# Altium PCB PCB_top.PcbDoc (part 2 of 2)
Units mil, origin at the board's own origin, x right, y up, seen from the top; angles counter-clockwise.
Board outline 2425.02 x 2425.02 mil, 4 copper layers (TOP, 2, 3, BOTTOM), stack 61.024 mil thick; 91 components, 64 nets, 335 pads, 235 vias.
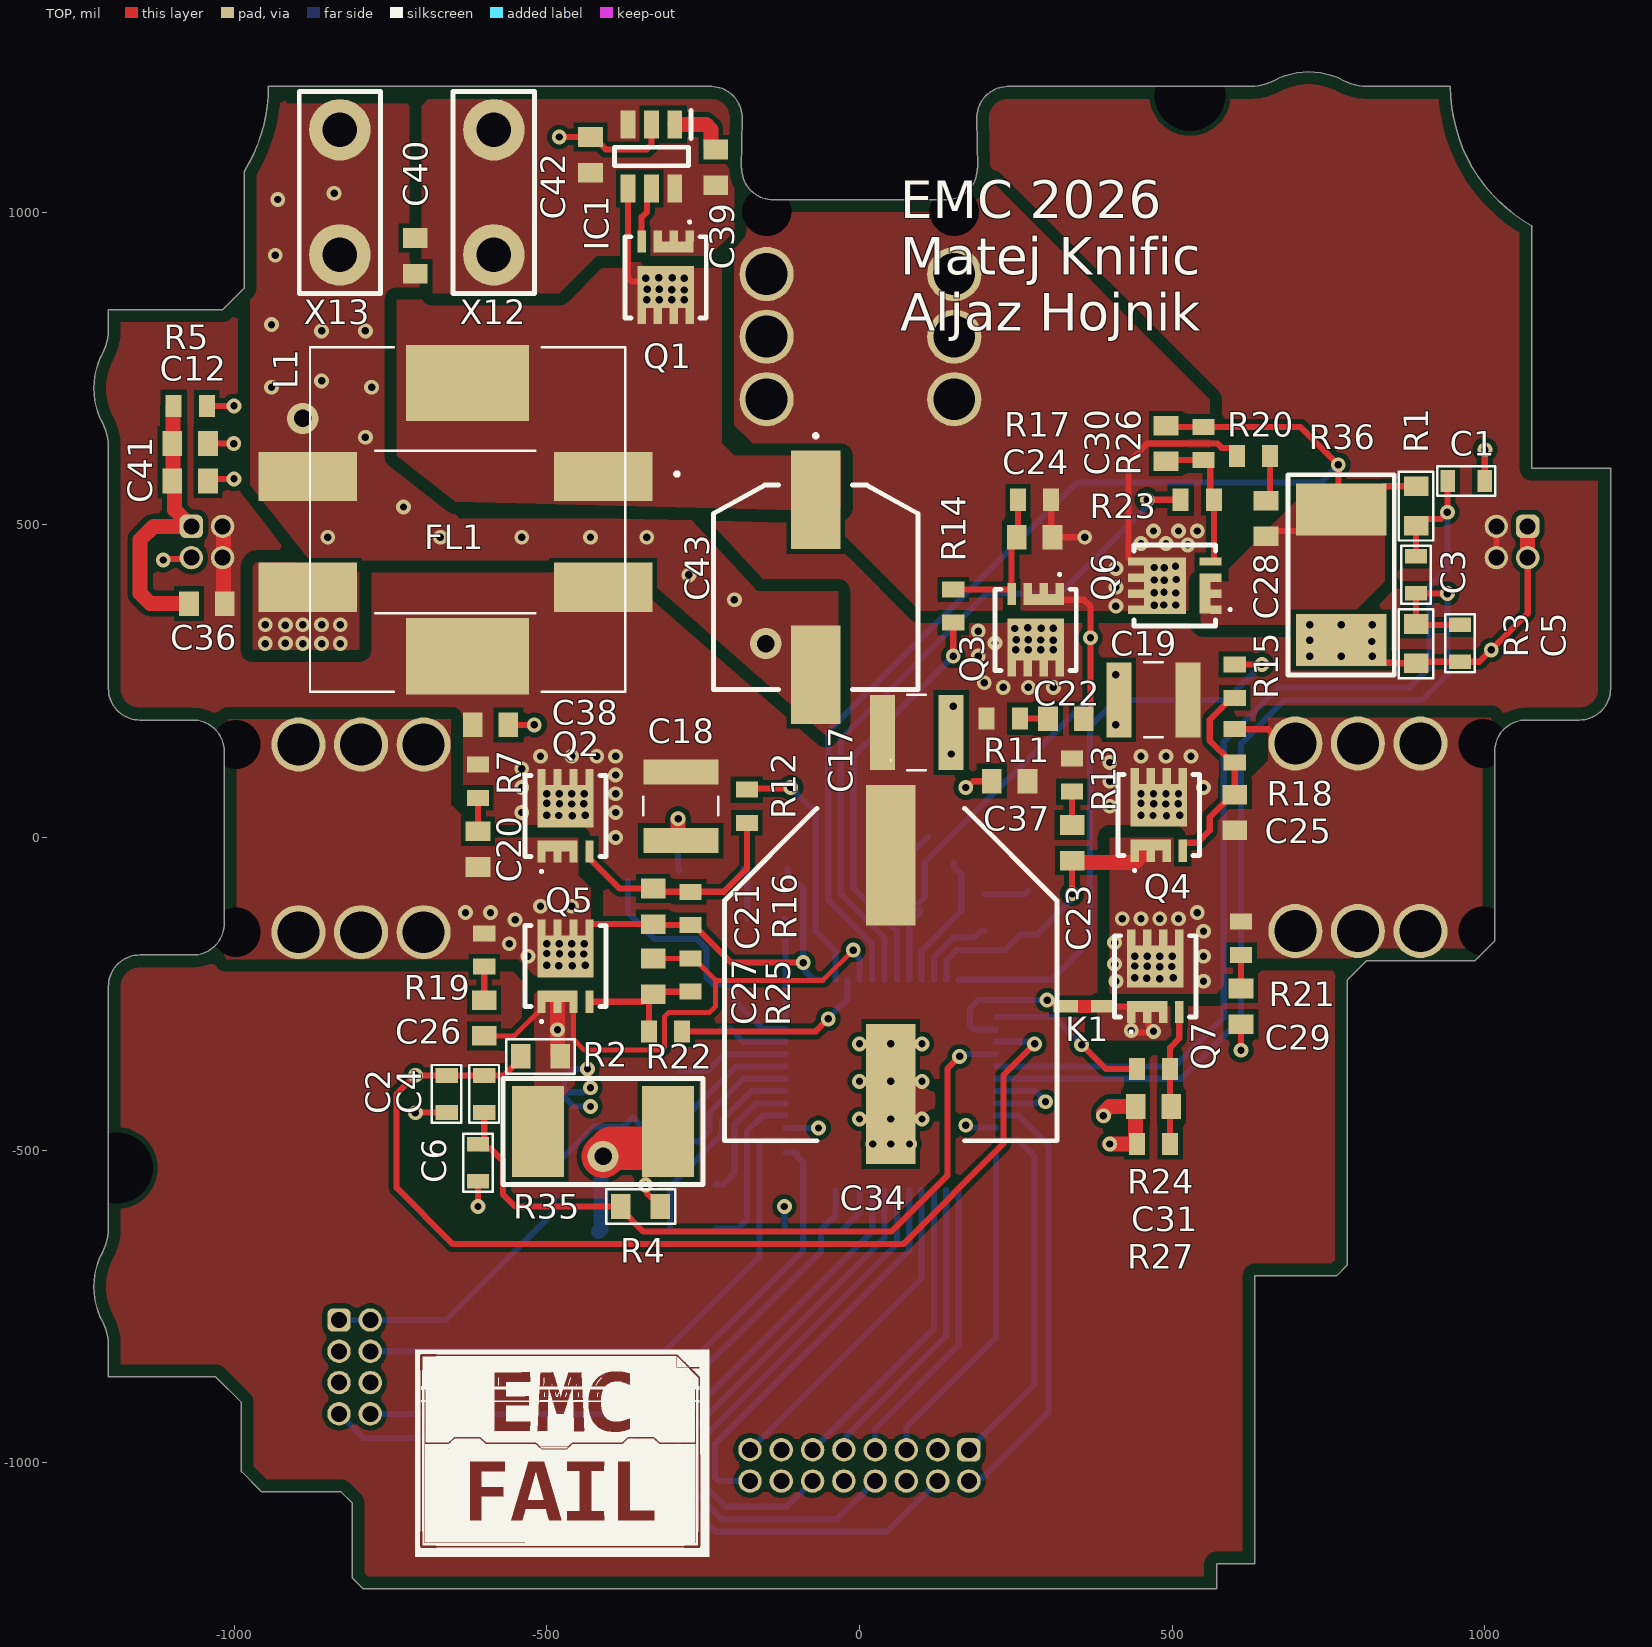
[diagram p0: TOP view]

## Silkscreen, mask and mechanical layers (free items; w line width, h text height) (continued)
Mechanical 3: (continued)
  lines w7.87: -188.94,1070.27 -187.67,1149.59 ccw(c-237.55,1150.91) -236.22,1200.79 -944.88,1200.79 cw(c-1200.79,1200.79) -983.78,1065.16 -983.78,878.43 -1018.03,844.17 -1200.79,844.17 -1200.79,811.49 cw(c-1279.53,811.49) -1210.16,774.22 ccw(c-1106.12,718.32) -1210.16,662.42 cw(c-1279.53,625.16) -1200.79,625.16 -1200.79,295.28 -1200.79,237.8 ccw(c-1150.79,237.8) -1150.79,187.8 -1065.75,187.8 cw(c-1065.75,137.8) -1015.75,137.8 -1015.75,-137.8 cw(c-1065.75,-137.8) -1065.75,-187.8 -1150.79,-187.8 ccw(c-1150.79,-237.8) -1200.79,-237.8 -1200.79,-295.28 -1200.79,-625.16 cw(c-1279.53,-625.16) -1210.16,-662.42 ccw(c-1106.12,-718.32) -1210.16,-774.22 cw(c-1279.53,-811.49) -1200.79,-811.49 -1200.79,-862.2 -1029.53,-862.2 -988.19,-903.54 -988.19,-1013.78 -955.71,-1046.26 -828.74,-1046.26 -811.02,-1063.98 -811.02,-1184.06 -794.29,-1200.79 -625.16,-1200.79 570.87,-1200.79 570.87,-1161.42 632.09,-1161.42 632.08,-700.99 762.53,-700.99 779.53,-683.99 779.53,-228.29 810.96,-196.85 984.44,-196.85 1015.75,-165.54 1015.75,137.8 cw(c1065.75,137.8) 1065.75,187.8 1150.79,187.8 ccw(c1150.79,237.8) 1200.79,237.8 1200.79,295.28 1200.79,590.55 1074.8,590.55 1074.8,978.04 ; -188.5,1070.27 ccw(c-137.92,1070.27) -137.92,1019.69 ; -137.8,1019.69 0,1019.69 137.8,1019.69 ; 137.92,1019.69 ccw(c137.92,1070.27) 188.5,1070.27 ; 188.94,1070.27 187.67,1149.59 cw(c237.55,1150.91) 236.22,1200.79 ; 240.16,1200.79 625.16,1200.79 ccw(c625.16,1279.53) 662.42,1210.16 cw(c718.32,1106.12) 774.22,1210.16 ccw(c811.49,1279.53) 811.49,1200.79 944.88,1200.79 ccw(c1200.79,1200.79) 1075.51,977.64
Mechanical 4:
  circle w10: c0,0 r1043.31
  circle w3.94: c-10,0 r1318.9
Mechanical 7:
  circle w3.94: c-1062.99,-846.46 r169.29
  circle w3.94: c-1062.99,-767.72 r169.29
  circle w3.94: c688.98,-1082.68 r147.64
  circle w3.94: c688.98,-885.83 r147.64
  circle w3.94: c19.68,-1082.68 r147.64
  circle w3.94: c98.43,-1082.68 r147.64
  circle w3.94: c177.17,-1082.68 r147.64
  circle w3.94: c-488.98,-1023.62 r169.29
  circle w3.94: c-333.07,-1023.62 r169.29
  circle w3.94: c-177.17,-1023.62 r169.29
Overlay print TOP:
  text "V" at -208.51,560.01 h39
  text "U" at -756.74,223.4 h39
  text "W" at 744.01,-268.7 h39
Mechanical 28:
  circle w10: c-896.85,-151.38 r32.85
  circle w10: c-896.85,148.62 r32.85
  circle w10: c-796.85,148.62 r32.85
  circle w10: c-796.85,-151.38 r32.85
  circle w10: c-696.85,-151.38 r32.85
  circle w10: c-696.85,148.62 r32.85
  circle w10: c-148.43,800.79 r32.85
  circle w10: c-148.43,700.79 r32.85
  circle w10: c-148.43,900.79 r32.85
  circle w10: c151.57,700.79 r32.85
  circle w10: c151.57,800.79 r32.85
  circle w10: c151.57,900.79 r32.85
  circle w10: c696.85,-149.61 r32.85
  circle w10: c696.85,150.39 r32.85
  circle w10: c796.85,150.39 r32.85
  circle w10: c796.85,-149.61 r32.85
  circle w10: c896.85,-149.61 r32.85
  circle w10: c896.85,150.39 r32.85